# Altium PCB photo_frame-v1.2.PcbDoc (part 4 of 5)
Units mm, origin at the board's own origin, x right, y up, seen from the top; angles counter-clockwise.
Board outline 704 x 370 mm, 2 copper layers (Top Layer, Bottom Layer), stack 1.57 mm thick; 268 components, 235 nets, 1088 pads, 1398 vias.
Unrouted connection lines stored in the file: 10.
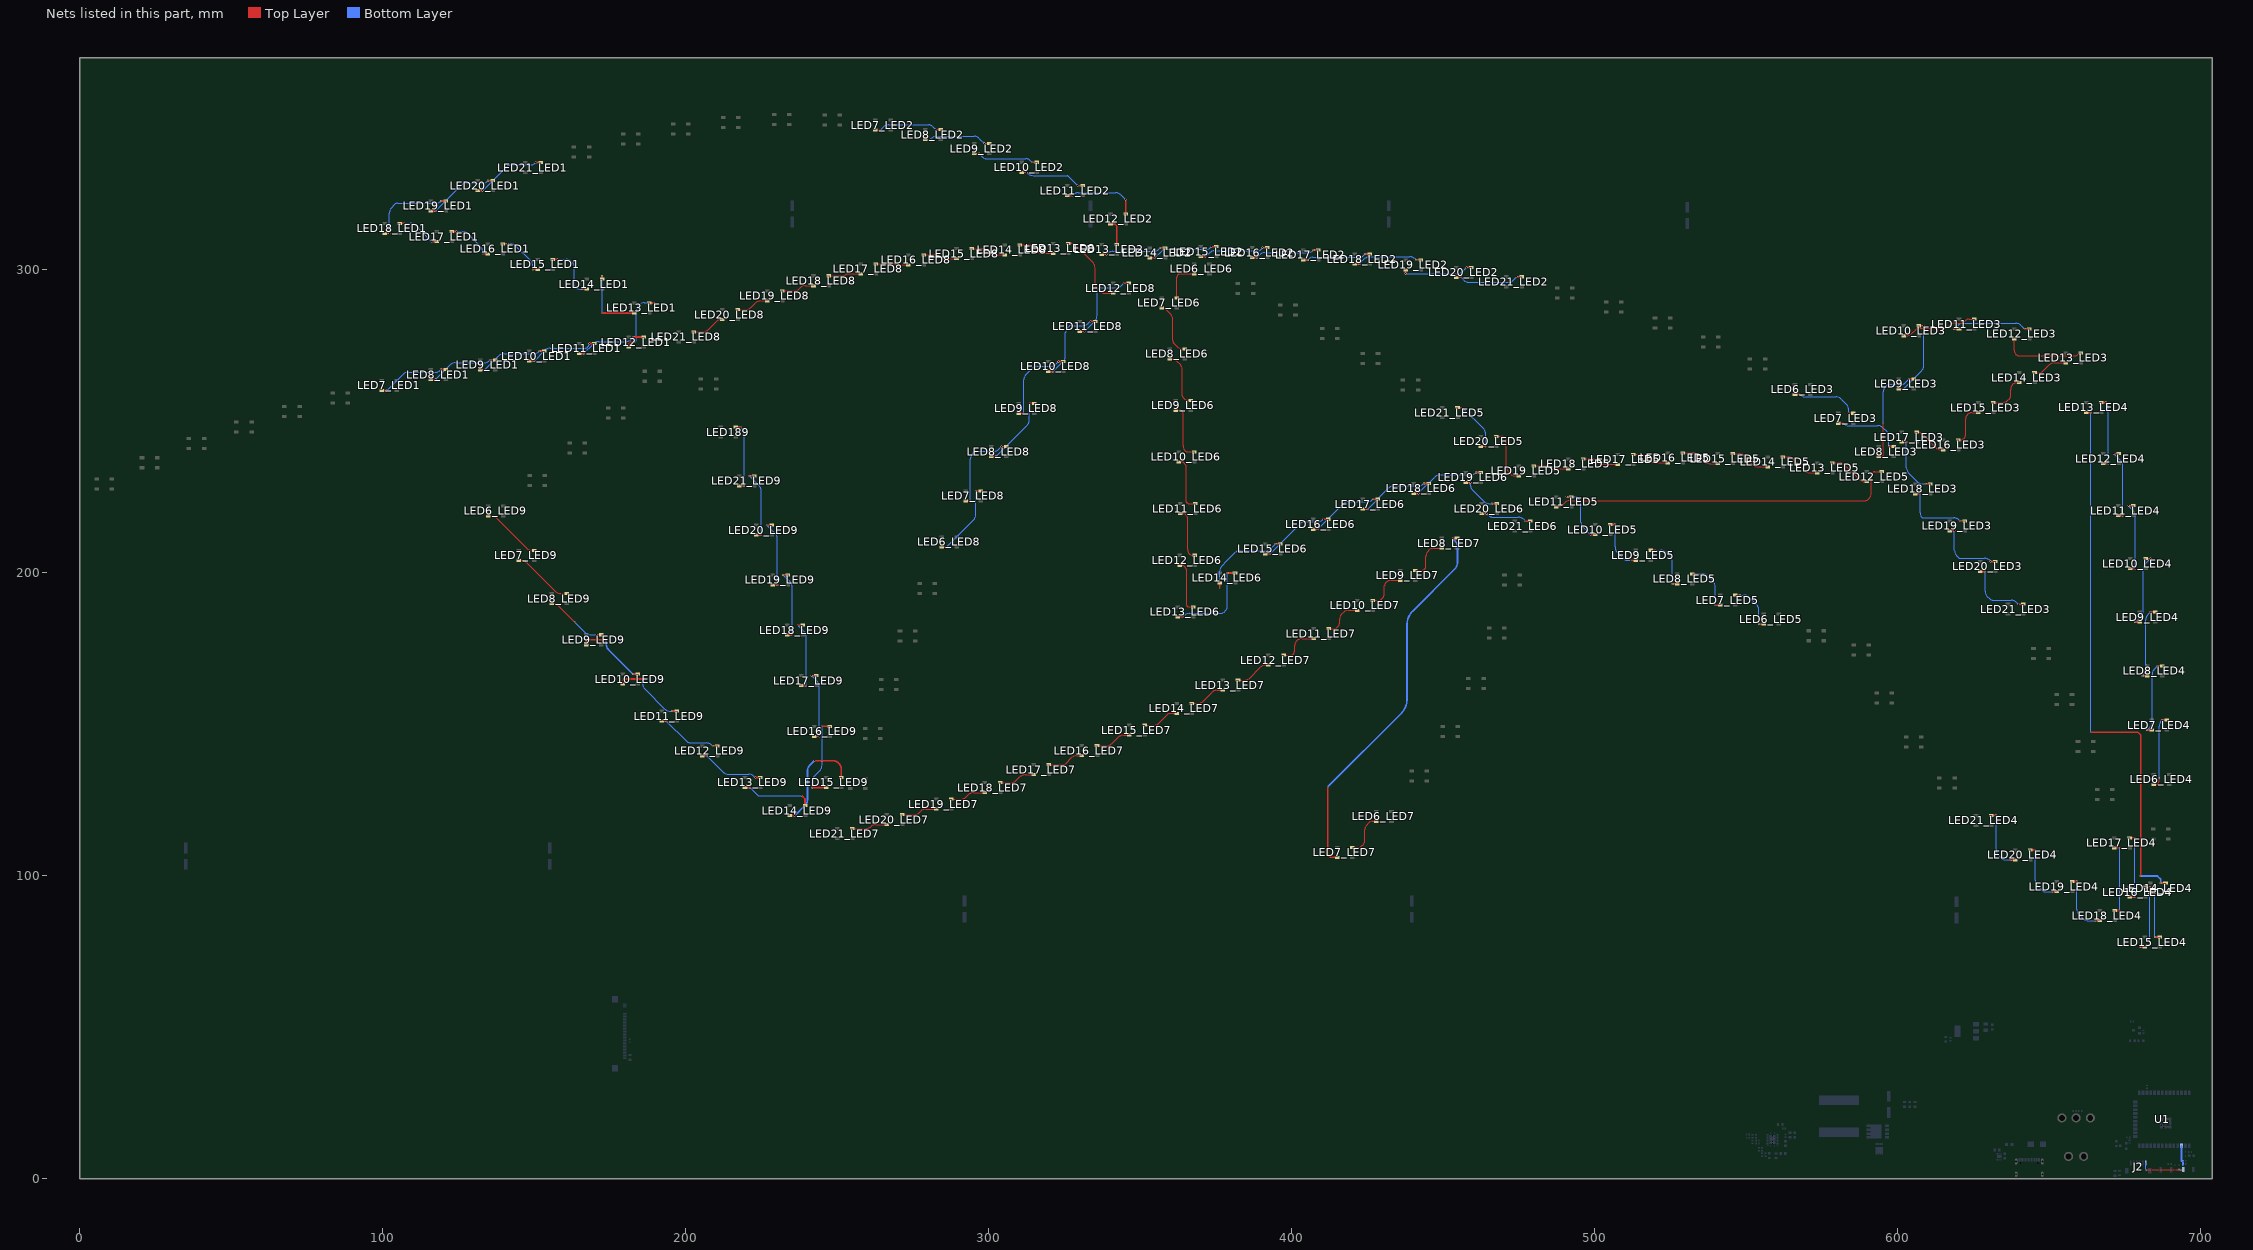
[diagram p3: the nets of this part, all layers, seen from the top]

## Via types
v1: diameter 0.6, hole 0.3, Top Layer to Bottom Layer, 709 vias
v2: diameter 0.6, hole 0.3, Top Layer to Bottom Layer, tented both sides, 689 vias

## Nets (pads, with @x,y where several pads share a name; then routed paths per layer and width w, separated by ;. In a path a pad name is that pad's centre, name@x,y a point inside that pad or via, vN(x,y) a via of type N, cw(c..) or ccw(c..) an arc to the next point about the centre after c; other vN are vias at no path point) (continued)
DOUT6_LED3: LED6_LED3.2 LED7_LED3.4 | length 22.9
  Top Layer w0.559: LED6_LED3.2@566.211,258.843 v2@567.806,258.843 ; v2@583.904,252.588 LED7_LED3.4@585.5,252.588
  Bottom Layer w0.305: v2(567.806,258.846) 567.921,258.732 ccw(c569.717,260.528) 569.717,257.988 579.744,257.988 cw(c579.744,255.448) 580.985,257.664 cw(c579.744,255.448) 581.54,257.244 583.16,255.624 cw(c581.364,253.828) 583.904,253.828 v2(583.904,252.592)
DOUT6_LED4: LED6_LED4.2 LED7_LED4.4 | length 24.4
  Top Layer w0.305: LED6_LED4.2@684.688,130.092 685.29,130.092 ccw(c685.29,131.675) 685.905,130.217 ccw(c684.688,131.434) 686.41,131.434 v2(686.41,132.182)
  Top Layer w0.559: v2@687.379,151.32 LED7_LED4.4@688.974,151.32
  Bottom Layer w0.305: v2(686.41,132.182) 686.41,149.295 cw(c688.95,149.295) 687.154,151.091 v2(687.379,151.316)
DOUT6_LED5: LED6_LED5.2 LED7_LED5.4 | length 16.4
  Top Layer w0.559: LED7_LED5.4@546.495,192.563 v2@548.09,192.563 ; v2@554.286,182.99 LED6_LED5.2@555.882,182.99
  Bottom Layer w0.305: v2(548.09,192.566) 549.306,192.566 cw(c549.306,190.026) 551.102,191.822 553.542,189.382 cw(c551.746,187.586) 554.286,187.586 v2(554.286,182.994)
DOUT6_LED6: LED6_LED6.2 LED7_LED6.4 | length 13.3
  Top Layer w0.305: LED7_LED6.4@362.198,290.636 362.198,297.555 cw(c363.206,297.555) 363.206,298.564 LED6_LED6.2@367.965,298.564
DOUT6_LED7: LED6_LED7.2 LED7_LED7.4 | length 14.3
  Top Layer w0.305: LED7_LED7.4@420.079,109.327 421.985,109.327 ccw(c421.985,111.389) 423.443,109.931 423.487,109.975 ccw(c421.691,111.771) 424.231,111.771 424.231,115.051 cw(c426.771,115.051) 424.975,116.847 425.552,117.424 cw(c426.735,116.241) 426.735,117.914 LED6_LED7.2@428.033,117.914
DOUT6_LED8: LED6_LED8.2 LED7_LED8.4 | length 25.5
  Top Layer w0.559: LED6_LED8.2@284.574,208.516 v2@286.169,208.516 ; v2@295.852,226.929 LED7_LED8.4@297.448,226.929
  Bottom Layer w0.305: v2(286.169,208.52) 295.108,217.458 ccw(c293.312,219.254) 295.852,219.254 v2(295.852,226.933)
DOUT6_LED9: LED6_LED9.2 LED7_LED9.4 | length 19.7
  Top Layer w0.305: LED6_LED9.2@134.841,218.702 135.83,218.702 cw(c135.83,216.162) 137.627,217.958 147.545,208.039 ccw(c149.341,209.835) 149.341,207.295 LED7_LED9.4@150.026,207.295
DOUT7_LED1: LED7_LED1.2 LED8_LED1.4 | length 23.8
  Top Layer w0.559: LED7_LED1.2@99.763,260.104 v2@101.359,260.104 ; v2@119.297,267.01 LED8_LED1.4@120.892,267.01
  Bottom Layer w0.305: v2(101.359,260.1) 106.612,265.353 cw(c108.408,263.557) 108.408,266.097 117.335,266.097 ccw(c117.335,268.637) 119.131,266.841 v2(119.297,267.007)
DOUT7_LED2: LED7_LED2.2 LED8_LED2.4 | length 22.7
  Top Layer w0.559: LED7_LED2.2@262.679,346.032 v2@264.275,346.032 ; v2@282.593,346.208 LED8_LED2.4@284.189,346.208
  Bottom Layer w0.305: v2(264.275,346.035) 265.272,347.033 cw(c267.068,345.237) 265.553,347.275 cw(c267.068,345.237) 267.068,347.777 280.365,347.777 cw(c280.365,346.178) 281.496,347.308 v2(282.593,346.211)
DOUT7_LED3: LED7_LED3.2 LED8_LED3.4 | length 23.6
  Top Layer w0.559: LED7_LED3.2@580.5,249.288 v2@582.095,249.288 ; v2@597.197,241.59 LED8_LED3.4@598.792,241.59
  Bottom Layer w0.305: v2(582.095,249.292) 582.148,249.239 ccw(c583.944,251.035) 583.944,248.495 593.522,248.495 cw(c593.522,246.058) 595.245,247.781 596.453,246.573 cw(c594.657,244.777) 597.197,244.777 v2(597.197,241.593)
DOUT7_LED4: LED7_LED4.2 LED8_LED4.4 | length 25.6
  Top Layer w0.559: v2@682.379,148.02 LED7_LED4.2@683.974,148.02 ; v2@685.899,169.203 LED8_LED4.4@687.495,169.203
  Bottom Layer w0.305: v2(682.379,148.023) 683.329,148.973 ccw(c681.533,150.769) 684.073,150.769 684.073,166.328 cw(c686.613,166.328) 684.736,168.04 cw(c686.613,166.328) 684.74,168.044 cw(c686.613,166.328) 684.817,168.124 v2(685.899,169.207)
DOUT7_LED5: LED7_LED5.2 LED8_LED5.4 | length 17.4
  Top Layer w0.559: LED8_LED5.4@532.347,199.573 v2@533.943,199.573 ; v2@539.899,189.263 LED7_LED5.2@541.495,189.263
  Bottom Layer w0.305: v2(533.943,199.577) 535.666,199.577 cw(c535.666,197.037) 537.462,198.833 539.155,197.14 cw(c537.359,195.344) 539.899,195.344 v2(539.899,189.266)
DOUT7_LED6: LED7_LED6.2 LED8_LED6.4 | length 17.9
  Top Layer w0.305: LED7_LED6.2@357.198,287.336 cw(c357.198,285.151) 358.743,286.696 360.091,285.348 cw(c358.295,283.552) 360.835,283.552 360.835,276.606 ccw(c362.192,276.606) 361.233,275.647 362.56,274.32 ccw(c363.772,275.533) 363.772,273.818 LED8_LED6.4@364.834,273.818
DOUT7_LED7: LED7_LED7.2 LED8_LED7.4 | length 127.1
  Top Layer w0.559: v2@411.988,129.286 411.988,107.442 ccw(c413.403,107.442) 413.403,106.027 LED7_LED7.2@415.079,106.027 ; v2@453.053,211.359 LED8_LED7.4@454.648,211.359
  Bottom Layer w0.559: v2(411.988,129.283) 436.2,153.495 ccw(c431.496,158.201) 438.15,158.201 438.15,182.803 438.15,182.805 cw(c444.464,182.805) 440,187.27 453.842,201.112 ccw(c451.501,203.455) 454.813,203.455 454.813,208.559 ccw(c452.311,208.559) 454.08,210.328 v2(453.053,211.356)
DOUT7_LED8: LED7_LED8.2 LED8_LED8.4 | length 29.3
  Top Layer w0.559: LED7_LED8.2@292.448,223.629 v2@294.043,223.629 ; v2@304.285,241.585 LED8_LED8.4@305.881,241.585
  Bottom Layer w0.305: v2(294.043,223.633) 294.043,237.442 cw(c296.583,237.442) 294.787,239.238 295.224,239.674 cw(c296.205,238.693) 296.205,240.081 302.031,240.081 ccw(c302.031,241.882) 303.305,240.608 v2(304.285,241.588)
DOUT7_LED9: LED7_LED9.2 LED8_LED9.4 | length 20.1
  Top Layer w0.305: LED7_LED9.2@145.026,203.995 145.838,203.995 cw(c145.838,201.455) 147.634,203.251 157.045,193.84 ccw(c158.841,195.636) 158.841,193.096 LED8_LED9.4@160.821,193.096
DOUT8_LED1: LED8_LED1.2 LED9_LED1.4 | length 23.8
  Top Layer w0.559: LED8_LED1.2@115.892,263.71 v2@117.488,263.71 ; v2@135.617,270.228 LED9_LED1.4@137.213,270.228
  Bottom Layer w0.305: v2(117.488,263.707) 122.309,268.528 cw(c124.105,266.732) 124.105,269.272 133.613,269.272 ccw(c133.613,271.812) 135.409,270.016 v2(135.617,270.225)
DOUT8_LED2: LED8_LED2.2 LED9_LED2.4 | length 22.4
  Top Layer w0.559: LED8_LED2.2@279.189,342.908 v2@280.785,342.908 ; v2@298.722,341.585 LED9_LED2.4@300.318,341.585
  Bottom Layer w0.305: v2(280.785,342.911) 281.147,343.274 cw(c282.943,341.478) 281.964,343.821 cw(c282.943,341.478) 282.943,344.018 295.241,344.018 cw(c295.241,341.478) 297.037,343.274 v2(298.722,341.588)
DOUT8_LED3: LED8_LED3.2 LED9_LED3.4 | length 34.9
  Top Layer w0.305: LED8_LED3.2@593.792,238.29 594.575,238.29 ccw(c594.575,239.028) 595.097,238.506 ccw(c594.476,239.126) 595.354,239.126 v2(595.354,249.409)
  Top Layer w0.559: v2@603.867,263.934 LED9_LED3.4@605.463,263.934
  Bottom Layer w0.305: v2(595.354,249.409) 595.354,259.682 cw(c597.894,259.682) 596.098,261.478 596.417,261.798 cw(c597.337,260.878) 597.337,262.179 601.472,262.179 ccw(c601.472,263.732) 602.57,262.634 v2(603.867,263.931)
DOUT8_LED4: LED8_LED4.2 LED9_LED4.4 | length 25.2
  Top Layer w0.559: v2@680.899,165.903 LED8_LED4.2@682.495,165.903 ; v2@683.478,186.981 LED9_LED4.4@685.074,186.981
  Bottom Layer w0.305: v2(680.899,165.907) 681.221,166.228 ccw(c679.425,168.024) 681.965,168.024 681.965,169.683 ccw(c682.051,169.683) 681.99,169.621 681.99,184.444 cw(c684.53,184.444) 682.272,185.608 cw(c684.53,184.444) 682.734,186.24 v2(683.478,186.985)
DOUT8_LED5: LED8_LED5.2 LED9_LED5.4 | length 18
  Top Layer w0.559: LED9_LED5.4@518.58,207.371 v2@520.176,207.371 ; v2@525.751,196.273 LED8_LED5.2@527.347,196.273
  Bottom Layer w0.305: v2(520.176,207.375) 521.95,207.375 cw(c521.95,204.835) 523.746,206.631 525.007,205.37 cw(c523.211,203.574) 525.751,203.574 v2(525.751,196.277)
DOUT8_LED6: LED8_LED6.2 LED9_LED6.4 | length 18.1
  Top Layer w0.305: LED8_LED6.2@359.834,270.518 360.378,270.518 cw(c360.378,267.978) 362.174,269.774 363.263,268.684 cw(c361.467,266.888) 364.007,266.888 364.007,258.318 ccw(c364.855,258.318) 364.256,257.719 364.678,257.297 ccw(c365.696,258.316) 365.696,256.875 LED9_LED6.4@366.754,256.875
DOUT8_LED7: LED8_LED7.2 LED9_LED7.4 | length 14.2
  Top Layer w0.305: LED9_LED7.4@440.907,200.742 442.902,200.742 ccw(c442.902,202.284) 443.992,201.193 ccw(c443.072,202.113) 444.373,202.113 444.373,205.272 cw(c446.913,205.272) 445.117,207.068 445.541,207.493 cw(c446.909,206.125) 446.909,208.059 LED8_LED7.2@449.648,208.059
DOUT8_LED8: LED8_LED8.2 LED9_LED8.4 | length 25.2
  Top Layer w0.559: LED8_LED8.2@300.881,238.285 v2@302.476,238.285 ; v2@313.454,255.885 LED9_LED8.4@315.05,255.885
  Bottom Layer w0.305: v2(302.476,238.288) 312.71,248.523 ccw(c310.914,250.319) 313.454,250.319 v2(313.454,255.889)
DOUT8_LED9: LED8_LED9.2 LED9_LED9.4 | length 20.4
  Top Layer w0.305: LED8_LED9.2@155.821,189.796 156.242,189.796 cw(c156.242,187.256) 158.039,189.052 v2(163.512,183.578)
  Top Layer w0.559: v2@170.605,179.482 LED9_LED9.4@172.2,179.482
  Bottom Layer w0.305: v2(163.512,183.578) 166.868,180.223 ccw(c168.664,182.019) 168.664,179.479 v2(170.605,179.479)
DOUT9_LED1: LED9_LED1.2 LED10_LED1.4 | length 23.6
  Top Layer w0.559: LED9_LED1.2@132.213,266.928 v2@133.809,266.928 ; v2@151.86,273.132 LED10_LED1.4@153.455,273.132
  Bottom Layer w0.305: v2(133.809,266.925) 138.409,271.525 cw(c140.205,269.729) 140.205,272.269 149.948,272.269 ccw(c149.948,274.809) 151.744,273.013 v2(151.86,273.128)
DOUT9_LED2: LED9_LED2.2 LED10_LED2.4 | length 21.7
  Top Layer w0.559: LED9_LED2.2@295.318,338.285 v2@296.914,338.285 ; v2@314.42,335.438 LED10_LED2.4@316.015,335.438
  Bottom Layer w0.305: v2(296.914,338.288) 297.901,337.301 ccw(c299.697,339.097) 299.697,336.557 312.293,336.557 cw(c312.293,334.115) 314.02,335.841 v2(314.42,335.441)
DOUT9_LED3: LED9_LED3.2 LED10_LED3.4 | length 26.7
  Top Layer w0.559: LED9_LED3.2@600.463,260.634 v2@602.058,260.634 ; LED10_LED3.4@607.079,281.475 v2@608.674,281.475
  Bottom Layer w0.305: v2(602.058,260.631) 607.93,266.503 ccw(c606.134,268.299) 608.674,268.299 v2(608.674,281.471)
DOUT9_LED4: LED9_LED4.2 LED10_LED4.4 | length 26
  Top Layer w0.559: v2@678.478,183.681 LED9_LED4.2@680.074,183.681 ; LED10_LED4.4@681.918,204.606 v2@683.514,204.606
  Bottom Layer w0.305: v2(678.478,183.685) 680.642,185.849 ccw(c679.343,187.148) 681.18,187.148 681.18,201.223 cw(c683.72,201.223) 681.924,203.02 v2(683.514,204.609)
DOUT9_LED5: LED9_LED5.2 LED10_LED5.4 | length 18
  Top Layer w0.559: LED10_LED5.4@505.22,215.855 v2@506.815,215.855 ; v2@511.985,204.071 LED9_LED5.2@513.58,204.071
  Bottom Layer w0.305: v2(506.815,215.858) 506.815,208.459 ccw(c509.355,208.459) 507.559,206.663 509.676,204.546 ccw(c510.815,205.685) 510.815,204.075 v2(511.985,204.075)
DOUT9_LED6: LED9_LED6.2 LED10_LED6.4 | length 18.6
  Top Layer w0.305: LED9_LED6.2@361.754,253.575 363.077,253.575 cw(c363.077,252.411) 363.9,253.234 cw(c363.077,252.411) 364.24,252.411 364.24,241.925 ccw(c366.78,241.925) 364.984,240.129 ccw(c365.64,240.785) 365.64,239.858 LED10_LED6.4@367.857,239.858
DOUT9_LED7: LED9_LED7.2 LED10_LED7.4 | length 13.9
  Top Layer w0.305: LED10_LED7.4@426.785,190.836 428.606,190.836 ccw(c428.606,192.551) 429.819,191.338 429.964,191.483 ccw(c428.168,193.279) 430.708,193.279 430.708,195.594 cw(c432.269,195.594) 431.165,196.698 cw(c432.961,194.902) 432.961,197.442 LED9_LED7.2@435.907,197.442
DOUT9_LED8: LED9_LED8.2 LED10_LED8.4 | length 28.5
  Top Layer w0.559: LED9_LED8.2@310.05,252.585 v2@311.646,252.585 ; v2@323.132,269.677 LED10_LED8.4@324.727,269.677
  Bottom Layer w0.305: v2(311.646,252.589) 311.646,263.578 cw(c314.186,263.578) 312.39,265.374 314.324,267.309 cw(c316.12,265.513) 316.12,268.053 320.452,268.053 ccw(c320.452,270.593) 322.248,268.797 v2(323.132,269.681)
DOUT9_LED9: LED9_LED9.2 LED10_LED9.4 | length 24.5
  Top Layer w0.559: LED9_LED9.2@167.2,176.182 167.2,177.317 167.715,177.832 v2(173.863,177.832) ; v2@182.67,166.503 LED10_LED9.4@184.265,166.503
  Bottom Layer w0.559: v2(173.863,177.832) 173.863,176.358 ccw(c176.403,176.358) 174.607,174.562 v2(182.67,166.499)
DOUT10_LED1: LED10_LED1.2 LED11_LED1.4 | length 23.9
  Top Layer w0.559: LED10_LED1.2@148.455,269.832 v2@150.051,269.832 ; v2@168.268,275.621 LED11_LED1.4@169.864,275.621
  Bottom Layer w0.305: v2(150.051,269.828) 153.544,273.322 cw(c155.341,271.526) 155.341,274.066 166.716,274.066 ccw(c166.716,275.618) v2(168.268,275.618)
DOUT10_LED2: LED10_LED2.2 LED11_LED2.4 | length 21.8
  Top Layer w0.559: LED10_LED2.2@311.015,332.138 v2@312.611,332.138 ; v2@329.482,327.716 LED11_LED2.4@331.077,327.716
  Bottom Layer w0.305: v2(312.611,332.141) 312.945,331.808 ccw(c314.741,333.604) 314.741,331.064 326.06,331.064 cw(c326.06,330.875) 326.193,331.008 v2(329.482,327.72)
DOUT10_LED3: LED10_LED3.2 LED11_LED3.4 | length 24.9
  Top Layer w0.305: LED10_LED3.2@602.079,278.175 602.928,278.175 ccw(c602.928,280.715) 604.724,278.919 605.681,279.875 cw(c607.477,278.079) 607.477,280.619 615.228,280.619 ccw(c615.228,283.159) 617.024,281.363 617.238,281.577 cw(c619.034,279.781) 619.034,282.321 620.635,282.321 ccw(c620.635,284.861) 622.431,283.065 622.593,283.227 cw(c623.661,282.159) 623.661,283.67 LED11_LED3.4@625.336,283.67
DOUT10_LED4: LED10_LED4.2 LED11_LED4.4 | length 24.8
  Top Layer w0.559: v2@676.242,222.081 LED11_LED4.4@677.838,222.081 ; LED10_LED4.2@676.918,201.306 v2@678.514,201.306
  Bottom Layer w0.305: v2(676.242,222.084) 677.77,220.557 ; 677.77,220.557 cw(c675.974,218.761) 677.846,220.477 cw(c675.974,218.761) 678.514,218.761 v2(678.514,201.309)
DOUT10_LED5: LED10_LED5.2 LED11_LED5.4 | length 20.8
  Top Layer w0.559: v2@490.746,225.024 LED11_LED5.4@492.342,225.024 ; v2@498.624,212.555 LED10_LED5.2@500.22,212.555
  Bottom Layer w0.305: v2(490.746,225.028) 494.107,225.028 495.532,223.603 495.532,216.687 ccw(c498.034,216.687) 496.265,214.918 v2(498.624,212.558)
DOUT10_LED6: LED10_LED6.2 LED11_LED6.4 | length 18
  Top Layer w0.305: LED10_LED6.2@362.857,236.558 363.341,236.558 cw(c363.341,234.537) 364.769,235.966 cw(c363.43,234.626) 365.324,234.626 365.324,223.404 ccw(c365.771,223.404) 365.455,223.088 ccw(c366.178,223.811) 366.178,222.789 LED11_LED6.4@368.288,222.789
DOUT10_LED7: LED10_LED7.2 LED11_LED7.4 | length 13.4
  Top Layer w0.305: LED11_LED7.4@412.307,181.489 413.908,181.489 ccw(c413.908,183.551) 414.317,181.53 ccw(c413.908,183.551) 415.366,182.093 ccw(c414.14,183.319) 415.874,183.319 415.874,184.556 cw(c418.389,184.556) 416.611,186.334 417.068,186.792 cw(c418.864,184.996) 418.864,187.536 LED10_LED7.2@421.785,187.536
DOUT10_LED8: LED10_LED8.2 LED11_LED8.4 | length 27.6
  Top Layer w0.559: LED10_LED8.2@319.727,266.377 v2@321.323,266.377 ; v2@333.597,282.911 LED11_LED8.4@335.192,282.911
  Bottom Layer w0.305: v2(321.323,266.374) 324.684,269.735 ccw(c322.888,271.531) 325.428,271.531 325.428,279.113 cw(c327.968,279.113) 326.172,280.909 326.288,281.026 cw(c327.515,279.799) 327.515,281.534 331.171,281.534 ccw(c331.171,284.074) 332.768,282.099 ccw(c331.171,284.074) 332.967,282.278 v2(333.597,282.907)
DOUT10_LED9: LED10_LED9.2 LED11_LED9.4 | length 24.9
  Top Layer w0.559: LED10_LED9.2@179.265,163.203 179.265,164.338 179.78,164.853 v2(185.928,164.853) ; v2@195.522,154.285 LED11_LED9.4@197.118,154.285
  Bottom Layer w0.305: v2(185.928,164.853) 185.928,163.213 ccw(c188.468,163.213) 186.672,161.416 193.063,155.026 ccw(c194.859,156.822) 194.859,154.282 v2(195.522,154.282)
DOUT11_LED1: LED11_LED1.2 LED12_LED1.4 | length 23.4
  Top Layer w0.559: LED11_LED1.2@164.864,272.321 v2@166.459,272.321 ; v2(182.875,277.749) LED12_LED1.4@186.28,277.749
  Bottom Layer w0.305: v2(166.459,272.318) 169.647,275.506 cw(c171.443,273.71) 171.443,276.25 180.323,276.25 ccw(c180.323,278.79) 182.119,276.994 v2(182.875,277.749)
DOUT11_LED2: LED11_LED2.2 LED12_LED2.4 | length 25
  Top Layer w0.559: LED11_LED2.2@326.077,324.416 v2@327.673,324.416 ; LED12_LED2.4@345.276,318.369 v2(345.276,323.088)
  Bottom Layer w0.305: v2(327.673,324.42) 327.883,324.63 cw(c329.679,322.834) 329.679,325.374 341.938,325.374 cw(c341.938,322.834) 343.734,324.63 v2(345.276,323.088)
DOUT11_LED3: LED11_LED3.2 LED12_LED3.4 | length 27.7
  Top Layer w0.559: v2@618.74,280.37 LED11_LED3.2@620.336,280.37 ; v2@641.955,280.465 LED12_LED3.4@643.551,280.465
  Bottom Layer w0.305: v2(618.74,280.366) 619.875,281.501 cw(c621.671,279.705) 621.671,282.245 639.12,282.245 cw(c639.12,279.705) 640.916,281.501 v2(641.955,280.461)
DOUT11_LED4: LED11_LED4.2 LED12_LED4.4 | length 24.8
  Top Layer w0.559: v2@671.409,239.237 LED12_LED4.4@673.004,239.237 ; LED11_LED4.2@672.838,218.781 v2@674.434,218.781
  Bottom Layer w0.305: v2(671.409,239.241) 673.69,236.959 cw(c671.894,235.163) 674.434,235.163 v2(674.434,218.784)
DOUT11_LED5: LED11_LED5.2 LED12_LED5.4 | length 116.1
  Top Layer w0.305: LED11_LED5.2@487.342,221.724 487.711,221.724 ccw(c487.711,224.264) 489.354,222.327 ccw(c487.711,224.264) 489.507,222.468 490.159,223.12 cw(c491.802,221.183) 491.802,223.723 589.093,223.723 ccw(c589.093,225.891) 590.626,224.358 ccw(c588.848,226.137) 591.363,226.137 591.363,231.732 cw(c593.184,231.732) 591.896,233.02 cw(c592.587,232.329) 592.587,233.306 LED12_LED5.4@594.82,233.306
DOUT11_LED6: LED11_LED6.2 LED12_LED6.4 | length 17.5
  Top Layer w0.305: LED11_LED6.2@363.288,219.489 363.966,219.489 cw(c363.966,217.264) 365.539,218.837 ; 365.201,219.075 cw(c363.784,217.657) 365.788,217.657 365.788,207.637 ccw(c368.328,207.637) 366.127,206.37 ccw(c367.693,207.936) 367.693,205.721 LED12_LED6.4@368.125,205.721
DOUT11_LED7: LED11_LED7.2 LED12_LED7.4 | length 13.7
  Top Layer w0.305: LED12_LED7.4@397.397,172.776 399.984,172.776 ccw(c399.984,173.624) 400.583,173.025 ccw(c399.541,174.067) 401.015,174.067 401.015,175.774 cw(c403.27,175.774) 401.676,177.368 401.752,177.445 cw(c403.548,175.649) 403.548,178.189 LED11_LED7.2@407.307,178.189
DOUT11_LED8: LED11_LED8.2 LED12_LED8.4 | length 27.9
  Top Layer w0.559: LED11_LED8.2@330.192,279.611 v2@331.788,279.611 ; v2@344.646,295.509 LED12_LED8.4@346.241,295.509
  Bottom Layer w0.305: v2(331.788,279.607) 335.095,282.914 ccw(c333.299,284.71) 335.486,283.419 ccw(c333.299,284.71) 335.839,284.71 335.839,292.887 cw(c336.268,292.887) 335.964,293.191 336.575,293.802 cw(c336.943,293.434) 336.943,293.954 342.042,293.954 ccw(c342.042,296.494) 343.64,294.52 ccw(c342.042,296.494) 343.758,294.622 ccw(c342.042,296.494) 343.838,294.698 v2(344.646,295.506)
  Bottom Layer w0.559: v2@344.644,295.508 v2@344.646,295.509
DOUT11_LED9: LED11_LED9.2 LED12_LED9.4 | length 21.5
  Top Layer w0.559: LED11_LED9.2@192.118,150.985 v2@193.713,150.985 ; v2@208.883,142.83 LED12_LED9.4@210.478,142.83
  Bottom Layer w0.305: v2(193.713,150.982) 200.187,144.508 ccw(c201.983,146.304) 201.983,143.764 206.893,143.764 cw(c206.893,141.224) 208.689,143.02 v2(208.883,142.826)
DOUT12_LED1: LED12_LED1.2 LED13_LED1.4 | length 22.6
  Top Layer w0.559: LED12_LED1.2@181.28,274.449 181.341,274.511 181.341,275.46 181.98,276.099 v2(182.875,276.099) ; LED13_LED1.4@188.067,288.999 v2@189.662,288.999
  Bottom Layer w0.305: v2(182.875,276.099) ccw(c182.875,277.004) 183.78,277.004 183.78,286.462 cw(c186.32,286.462) 186.32,289.002 v2(189.662,289.002)
DOUT12_LED2: LED12_LED2.2 LED13_LED2.4 | length 9
  Top Layer w0.559: LED12_LED2.2@340.276,315.069 341.775,315.069 342.355,314.489 342.355,313.963 ; LED13_LED2.4@342.355,308.336 342.355,313.963 ; 342.355,313.436 342.355,313.963
DOUT12_LED3: LED12_LED3.2 LED13_LED3.4 | length 27.1
  Top Layer w0.305: LED12_LED3.2@638.551,277.165 638.551,273.309 ccw(c640.334,273.309) 640.334,271.526 658.173,271.526 ; 658.174,271.526 ccw(c658.175,274.202) 659.92,272.172 LED13_LED3.4@660.515,272.52
DOUT12_LED4: LED12_LED4.2 LED13_LED4.4 | length 23.6
  Top Layer w0.559: LED13_LED4.4@667.279,256.148 v2@668.875,256.148 ; LED12_LED4.2@668.004,235.937 v2@669.6,235.937
  Bottom Layer w0.305: v2(668.875,256.151) cw(c667.123,254.4) 669.6,254.4 v2(669.6,235.941)
DOUT12_LED5: LED12_LED5.2 LED13_LED5.4 | length 13.6
  Top Layer w0.305: LED13_LED5.4@578.557,236.22 580.912,236.22 cw(c580.912,233.68) 582.709,235.476 587.435,230.75 ccw(c589.231,232.546) 589.231,230.006 LED12_LED5.2@589.82,230.006
DOUT12_LED6: LED12_LED6.2 LED13_LED6.4 | length 17.1
  Top Layer w0.305: LED12_LED6.2@363.125,202.421 363.455,202.421 cw(c363.455,200.311) 364.947,201.803 cw(c363.898,200.753) 365.382,200.753 365.382,189.26 ccw(c365.892,189.26) 365.531,188.9 ccw(c366.07,189.438) 366.07,188.677 LED13_LED6.4@367.526,188.677
DOUT12_LED7: LED12_LED7.2 LED13_LED7.4 | length 11.9
  Top Layer w0.305: LED13_LED7.4@382.371,164.546 384.675,164.546 ccw(c384.675,166.785) 386.258,165.202 389.789,168.732 cw(c391.585,166.936) 391.585,169.476 LED12_LED7.2@392.397,169.476
DOUT12_LED8: LED12_LED8.2 LED13_LED8.4 | length 25.5
  Top Layer w0.305: LED13_LED8.4@326.393,308.667 327.16,308.667 cw(c327.16,306.127) 328.442,308.32 cw(c327.16,306.127) 328.956,307.923 334.434,302.445 cw(c332.638,300.649) 335.178,300.649 335.178,295.427 ccw(c337.57,295.427) 335.879,293.736 336.662,292.953 ccw(c338.458,294.749) 338.458,292.209 LED12_LED8.2@341.241,292.209
DOUT12_LED9: LED12_LED9.2 LED13_LED9.4 | length 21.9
  Top Layer w0.559: LED12_LED9.2@205.478,139.53 v2@207.074,139.53 ; v2@223.056,132.39 LED13_LED9.4@224.651,132.39
  Bottom Layer w0.305: v2(207.074,139.526) 212.43,134.17 ccw(c214.226,135.966) 214.226,133.426 220.964,133.426 cw(c220.964,130.886) 222.761,132.682 v2(223.056,132.387)
DOUT13_LED1: LED13_LED1.2 LED14_LED1.4 | length 23.9
  Top Layer w0.559: LED14_LED1.4@172.458,296.873 v2(172.458,297.942) ; v2(172.466,285.75) 172.477,285.75 172.525,285.702 183.063,285.702 LED13_LED1.2@183.067,285.699
  Bottom Layer w0.305: v2(172.458,297.942) 172.462,297.938 172.462,285.754 v2(172.466,285.75)
DOUT13_LED2: LED13_LED2.2 LED14_LED2.4 | length 21.6
  Top Layer w0.559: LED13_LED2.2@337.355,305.036 v2@338.951,305.036 ; v2@356.674,307.167 LED14_LED2.4@358.27,307.167
  Bottom Layer w0.305: v2@338.964,305.029 cw(c341.045,303.333) 341.045,306.017 354.203,306.017 354.543,306.017 ccw(c354.543,308.388) 356.22,306.712 356.665,307.157 v2@356.665,307.178
  other v2: 338.951,305.04 356.674,307.17
DOUT13_LED3: LED13_LED3.2 LED14_LED3.4 | length 11.4
  Top Layer w0.305: LED14_LED3.4@645.261,265.969 646.863,265.969 ccw(c646.863,267.512) 647.954,266.421 650.01,268.476 cw(c651.806,266.68) 651.806,269.22 LED13_LED3.2@655.515,269.22
DOUT13_LED4: LED13_LED4.2 LED14_LED4.4 | length 180.4
  Top Layer w0.559: LED13_LED4.2@662.279,252.848 v2@663.875,252.848 ; v2(663.883,147.301) 679.402,147.301 680.291,146.412 v2(680.291,99.829) ; v2@686.896,97.53 LED14_LED4.4@688.491,97.53
  Bottom Layer w0.305: v2(663.875,252.851) 663.875,147.309 v2(663.883,147.301)
  Bottom Layer w0.559: v2(680.291,99.829) 685.879,99.829 686.896,98.812 v2(686.896,97.534)
DOUT13_LED5: LED13_LED5.2 LED14_LED5.4 | length 13.4
  Top Layer w0.305: LED14_LED5.4@562.148,238.227 563.793,238.227 cw(c563.793,235.687) 565.589,237.483 569.408,233.664 ccw(c571.204,235.46) 571.018,232.927 ccw(c571.204,235.46) 571.204,232.92 LED13_LED5.2@573.557,232.92
DOUT13_LED6: LED13_LED6.2 LED14_LED6.4 | length 31.5
  Top Layer w0.559: LED13_LED6.2@362.526,185.377 v2@364.122,185.377 ; v2(378.869,199.905) 378.881,199.905 378.907,199.878 LED14_LED6.4@381.369,199.878
  Bottom Layer w0.305: v2(364.122,185.373) 364.535,185.787 cw(c366.258,184.064) 366.258,186.5 376.329,186.5 ccw(c376.329,189.04) 378.869,189.04 v2(378.869,199.905)
DOUT13_LED7: LED13_LED7.2 LED14_LED7.4 | length 11.8
  Top Layer w0.305: LED14_LED7.4@367.145,156.825 369.057,156.825 ccw(c369.057,159.365) 370.853,157.569 373.786,160.502 cw(c375.582,158.706) 375.582,161.246 LED13_LED7.2@377.371,161.246
DOUT13_LED8: LED13_LED8.2 LED14_LED8.4 | length 11.9
  Top Layer w0.305: LED14_LED8.4@310.402,308.184 312.835,308.184 cw(c312.835,305.644) 314.632,307.44 316.027,306.045 ccw(c317.662,307.68) 317.467,305.376 ccw(c317.662,307.68) 317.662,305.367 LED13_LED8.2@321.393,305.367
DOUT13_LED9: LED13_LED9.2 LED14_LED9.4 | length 23.6
  Top Layer w0.559: LED13_LED9.2@219.651,129.09 v2@221.247,129.09 ; v2(238.382,126.352) 239.46,125.275 LED14_LED9.4@239.46,123.094
  Bottom Layer w0.305: v2(221.247,129.087) 223.149,127.185 223.982,126.352 225.16,126.352 v2(238.382,126.352)
DOUT14_LED1: LED14_LED1.2 LED15_LED1.4 | length 19.2
  Top Layer w0.559: LED15_LED1.4@156.259,303.381 v2@157.855,303.381 ; v2@165.862,293.573 LED14_LED1.2@167.458,293.573
  Bottom Layer w0.305: v2(157.855,303.377) 160.695,303.377 cw(c160.695,300.837) 162.491,302.633 162.763,302.362 cw(c161.537,301.135) 163.271,301.135 163.271,294.851 ccw(c163.965,294.851) 163.474,294.361 ; 163.474,294.361 163.521,294.314 ccw(c165.317,296.11) 165.317,293.57 v2(165.862,293.57)
DOUT14_LED2: LED14_LED2.2 LED15_LED2.4 | length 23.2
  Top Layer w0.559: LED14_LED2.2@353.27,303.867 v2@354.866,303.867 ; v2@373.55,307.561 LED15_LED2.4@375.146,307.561
  Bottom Layer w0.305: v2(354.866,303.87) 356.963,305.968 cw(c358.759,304.172) 358.759,306.712 371.983,306.712 ccw(c371.983,308.435) 373.201,307.216 v2(373.55,307.565)
DOUT14_LED3: LED14_LED3.2 LED15_LED3.4 | length 13.2
  Top Layer w0.305: LED15_LED3.4@631.65,256.113 634.69,256.113 ccw(c634.69,258.653) 636.486,256.857 637.032,257.404 ccw(c636.235,258.201) 637.362,258.201 637.362,260.368 cw(c639.902,260.368) 637.848,261.862 cw(c639.902,260.368) 638.106,262.164 638.229,262.287 cw(c639.15,261.367) 639.15,262.669 LED14_LED3.2@640.261,262.669
DOUT14_LED4: LED14_LED4.2 LED15_LED4.4 | length 17.6
  Top Layer w0.559: LED14_LED4.2@683.491,94.23 v2(684.98,94.23) ; v2@684.98,79.711 LED15_LED4.4@686.576,79.711
  Bottom Layer w0.305: v2(684.98,79.714) v2(684.98,94.23)
DOUT14_LED5: LED14_LED5.2 LED15_LED5.4 | length 13.1
  Top Layer w0.305: LED15_LED5.4@545.69,239.299 547.531,239.299 cw(c547.531,236.759) 549.328,238.555 552.212,235.671 ccw(c554.008,237.467) 553.767,234.938 ccw(c554.008,237.467) 554.008,234.927 LED14_LED5.2@557.148,234.927
DOUT14_LED6: LED14_LED6.2 LED15_LED6.4 | length 31.4
  Top Layer w0.559: v2(376.369,194.818) LED14_LED6.2@376.369,196.578 ; v2@394.76,209.505 LED15_LED6.4@396.355,209.505
  Bottom Layer w0.305: v2(376.369,194.818) 376.369,198.222 376.369,200.475 cw(c378.909,200.475) 377.113,202.271 378.706,203.863 381.363,206.52 cw(c383.159,204.724) 383.159,207.264 391.47,207.264 ccw(c391.47,209.804) 393.266,208.008 v2(394.76,209.501)
DOUT14_LED7: LED14_LED7.2 LED15_LED7.4 | length 12
  Top Layer w0.305: LED15_LED7.4@351.524,149.662 354.829,149.662 ccw(c354.829,151.291) 355.981,150.139 358.623,152.781 cw(c360.419,150.985) 360.419,153.525 LED14_LED7.2@362.145,153.525
DOUT14_LED8: LED14_LED8.2 LED15_LED8.4 | length 11.6
  Top Layer w0.305: LED15_LED8.4@294.451,306.939 297.138,306.939 cw(c297.138,304.399) 298.934,306.195 299.502,305.628 ccw(c301.298,307.424) 301.298,304.884 LED14_LED8.2@305.402,304.884
DOUT14_LED9: LED14_LED9.2 LED15_LED9.4 | length 35.4
  Top Layer w0.559: LED14_LED9.2@234.46,119.794 v2@236.055,119.794 ; v2(242.529,137.922) 248.63,137.922 cw(c248.63,135.382) 250.426,137.178 250.698,136.906 cw(c248.969,135.177) 251.414,135.177 LED15_LED9.4@251.414,132.378
  Bottom Layer w0.559: v2(236.055,119.791) 239.54,123.275 ccw(c237.744,125.071) 240.284,125.071 240.284,134.624 cw(c242.824,134.624) 241.028,136.42 v2(242.529,137.922)
DOUT15_LED1: LED15_LED1.2 LED16_LED1.4 | length 16.1
  Top Layer w0.559: LED16_LED1.4@139.666,308.527 v2@141.261,308.527 ; v2@149.664,300.081 LED15_LED1.2@151.259,300.081
  Bottom Layer w0.305: v2(141.261,308.524) 142.239,308.524 cw(c142.239,305.984) 144.035,307.78 148.92,302.896 cw(c147.124,301.1) 149.664,301.1 v2(149.664,300.084)
DOUT15_LED2: LED15_LED2.2 LED16_LED2.4 | length 23
  Top Layer w0.559: LED15_LED2.2@370.146,304.261 v2@371.741,304.261 ; v2@390.485,307.244 LED16_LED2.4@392.081,307.244
  Bottom Layer w0.305: v2(371.741,304.265) 373.139,305.663 cw(c374.348,304.454) 374.348,306.163 388.047,306.163 388.84,306.163 ccw(c388.84,307.522) 389.801,306.561 390.482,307.243 v2@390.482,307.25
  other v2: 390.485,307.248
DOUT15_LED3: LED15_LED3.2 LED16_LED3.4 | length 13.9
  Top Layer w0.305: LED16_LED3.4@620.093,243.792 620.643,243.792 ccw(c620.643,245.776) 622.046,244.373 ccw(c620.881,245.539) 622.529,245.539 622.529,250.699 cw(c624.61,250.699) 623.138,252.171 cw(c624.688,250.621) 624.566,252.81 cw(c624.688,250.621) 624.688,252.813 LED15_LED3.2@626.65,252.813
DOUT15_LED4: LED15_LED4.2 LED16_LED4.4 | length 25.6
  Top Layer w0.559: v2@679.98,76.411 LED15_LED4.2@681.576,76.411 ; LED16_LED4.4@681.773,96.19 v2@683.369,96.19
  Bottom Layer w0.305: v2(679.98,76.414) 681.48,76.414 ccw(c681.48,78.285) 682.803,76.962 682.871,77.031 ccw(c681.67,78.232) 683.369,78.232 v2(683.369,96.193)
DOUT15_LED5: LED15_LED5.2 LED16_LED5.4 | length 12.7
  Top Layer w0.305: LED16_LED5.4@529.214,239.543 532.251,239.543 cw(c532.251,237.003) 534.047,238.799 536.103,236.743 ccw(c537.899,238.539) 537.482,236.033 ccw(c537.899,238.539) 537.899,235.999 LED15_LED5.2@540.69,235.999
DOUT15_LED6: LED15_LED6.2 LED16_LED6.4 | length 25.3
  Top Layer w0.559: LED15_LED6.2@391.355,206.205 v2@392.951,206.205 ; v2@410.533,217.607 LED16_LED6.4@412.129,217.607
  Bottom Layer w0.305: v2(392.951,206.201) 402.725,215.975 cw(c404.521,214.179) 404.521,216.719 408.596,216.719 ccw(c408.596,219.259) 410.313,217.387 ccw(c408.596,219.259) 410.393,217.463 v2(410.533,217.604)
  Bottom Layer w0.559: v2@410.531,217.606 v2@410.533,217.607
DOUT15_LED7: LED15_LED7.2 LED16_LED7.4 | length 11.9
  Top Layer w0.305: LED16_LED7.4@335.827,142.855 339.009,142.855 ccw(c339.009,145.395) 340.805,143.599 342.824,145.618 cw(c344.62,143.822) 344.62,146.362 LED15_LED7.2@346.524,146.362
DOUT15_LED8: LED15_LED8.2 LED16_LED8.4 | length 11.2
  Top Layer w0.305: LED16_LED8.4@278.586,304.855 282.148,304.855 cw(c282.148,302.672) 283.693,304.216 ccw(c285.085,305.608) 285.085,303.639 LED15_LED8.2@289.451,303.639
DOUT15_LED9: LED15_LED9.2 LED16_LED9.4 | length 28.4
  Top Layer w0.559: v2(241.808,129.078) LED15_LED9.2@246.414,129.078 ; v2(245.069,149.274) 245.081,149.274 245.107,149.248 LED16_LED9.4@247.569,149.248
  Bottom Layer w0.305: v2(241.808,129.078) 241.808,131.009 cw(c244.348,131.009) 242.552,132.805 244.326,134.578 ccw(c242.529,136.374) 245.069,136.374 v2(245.069,149.274)
DOUT16_LED1: LED16_LED1.2 LED17_LED1.4 | length 15.6
  Top Layer w0.559: LED17_LED1.4@122.852,312.568 v2@124.448,312.568 ; v2@133.07,305.227 LED16_LED1.2@134.666,305.227
  Bottom Layer w0.305: v2(124.448,312.565) 126.387,312.565 cw(c126.387,310.025) 128.183,311.821 132.326,307.678 cw(c130.53,305.882) 133.07,305.882 v2(133.07,305.23)
DOUT16_LED2: LED16_LED2.2 LED17_LED2.4 | length 22.7
  Top Layer w0.559: LED16_LED2.2@387.081,303.944 v2@388.676,303.944 ; v2@407.327,306.495 LED17_LED2.4@408.923,306.495
  Bottom Layer w0.305: v2(388.676,303.948) 389.604,304.875 cw(c391.4,303.079) 391.4,305.619 405.396,305.619 ccw(c405.396,308.159) 407.192,306.363 v2(407.327,306.498)
DOUT16_LED3: LED16_LED3.2 LED17_LED3.4 | length 10.9
  Top Layer w0.305: LED17_LED3.4@606.39,246.353 606.517,246.353 cw(c606.517,243.813) 608.313,245.609 612.686,241.236 ccw(c614.482,243.032) 614.482,240.492 LED16_LED3.2@615.093,240.492
DOUT16_LED4: LED16_LED4.2 LED17_LED4.4 | length 22.9
  Top Layer w0.559: LED17_LED4.4@676.615,112.455 v2@678.363,112.455 ; LED16_LED4.2@676.773,92.89 v2@678.369,92.89
  Bottom Layer w0.305: v2(678.363,112.458) 678.363,92.899 v2(678.369,92.893)
DOUT16_LED5: LED16_LED5.2 LED17_LED5.4 | length 12.3
  Top Layer w0.305: LED17_LED5.4@512.781,238.981 515.084,238.981 cw(c515.084,236.441) 516.88,238.237 518.13,236.987 ccw(c519.926,238.783) 519.926,236.243 LED16_LED5.2@524.214,236.243
DOUT16_LED6: LED16_LED6.2 LED17_LED6.4 | length 25.3
  Top Layer w0.559: LED16_LED6.2@407.129,214.307 v2@408.724,214.307 ; v2@426.942,224.237 LED17_LED6.4@428.537,224.237
  Bottom Layer w0.305: v2(408.724,214.304) 417.101,222.681 cw(c418.898,220.885) 418.898,223.425 425.081,223.425 ccw(c425.081,225.965) 426.877,224.169 v2(426.942,224.233)
DOUT16_LED7: LED16_LED7.2 LED17_LED7.4 | length 11.9
  Top Layer w0.305: LED17_LED7.4@319.927,136.581 324.39,136.581 ccw(c324.39,138.297) 325.603,137.084 327.33,138.811 cw(c329.126,137.015) 329.126,139.555 LED16_LED7.2@330.827,139.555
DOUT16_LED8: LED16_LED8.2 LED17_LED8.4 | length 10.8
  Top Layer w0.305: LED17_LED8.4@262.853,301.859 263.195,301.859 cw(c263.365,301.689) 263.365,301.93 268.558,301.93 cw(c268.558,301.071) 268.872,301.87 cw(c268.558,301.071) 269.165,301.678 ccw(c269.712,302.834) 269.712,301.555 LED16_LED8.2@273.586,301.555
DOUT16_LED9: LED16_LED9.2 LED17_LED9.4 | length 24.2
  Top Layer w0.559: v2@241.612,165.97 LED17_LED9.4@243.208,165.97 ; LED16_LED9.2@242.569,145.948 v2@244.165,145.948
  Bottom Layer w0.305: v2(241.612,165.967) 243.421,164.158 cw(c241.625,162.362) 244.165,162.362 v2(244.165,145.945)
DOUT17_LED1: LED17_LED1.2 LED18_LED1.4 | length 14.6
  Top Layer w0.559: LED18_LED1.4@105.669,315.289 v2@107.265,315.289 ; v2@116.256,309.268 LED17_LED1.2@117.852,309.268
  Bottom Layer w0.305: v2(107.265,315.293) 109.183,315.293 cw(c109.183,312.753) 110.979,314.549 v2(116.256,309.272)
DOUT17_LED2: LED17_LED2.2 LED18_LED2.4 | length 22.6
  Top Layer w0.559: LED17_LED2.2@403.923,303.195 v2@405.519,303.195 ; v2@424.234,305.139 LED18_LED2.4@425.83,305.139
  Bottom Layer w0.305: v2(405.519,303.198) 405.926,303.605 cw(c407.087,302.445) 407.087,304.086 421.777,304.086 422.478,304.086 ccw(c422.478,305.778) 423.674,304.582 v2(424.234,305.142) v2(424.234,305.142)
DOUT17_LED3: LED17_LED3.2 LED18_LED3.4 | length 20.5
  Top Layer w0.559: LED17_LED3.2@601.39,243.053 v2@602.985,243.053 ; v2@609.282,229.308 LED18_LED3.4@610.878,229.308
  Bottom Layer w0.305: v2(602.985,243.05) 602.985,234.616 ccw(c605.525,234.616) 603.729,232.82 606.704,229.845 ccw(c608.007,231.147) 608.007,229.305 v2(609.282,229.305)
DOUT17_LED4: LED17_LED4.2 LED18_LED4.4 | length 24.1
  Top Layer w0.559: LED17_LED4.2@671.615,109.155 v2@673.414,109.155 ; LED18_LED4.4@671.819,88.44 v2@673.414,88.44
  Bottom Layer w0.305: v2(673.414,88.443) v2(673.414,109.158)
DOUT17_LED5: LED17_LED5.2 LED18_LED5.4 | length 12
  Top Layer w0.305: LED18_LED5.4@496.298,237.558 498.955,237.558 cw(c498.955,235.018) 500.751,236.814 501.167,236.398 ccw(c502.898,238.128) 502.898,235.681 LED17_LED5.2@507.781,235.681
DOUT17_LED6: LED17_LED6.2 LED18_LED6.4 | length 25.1
  Top Layer w0.559: LED17_LED6.2@423.537,220.937 v2@425.133,220.937 ; v2@443.731,229.418 LED18_LED6.4@445.327,229.418
  Bottom Layer w0.305: v2(425.133,220.933) 432.037,227.837 cw(c433.833,226.041) 433.833,228.581 441.845,228.581 ccw(c441.845,231.121) 443.561,229.249 ccw(c441.845,231.121) 443.641,229.325 v2(443.731,229.415)
  Bottom Layer w0.559: v2@443.729,229.417 v2@443.731,229.418
DOUT17_LED7: LED17_LED7.2 LED18_LED7.4 | length 12.2
  Top Layer w0.305: LED18_LED7.4@303.849,130.663 307.48,130.663 ccw(c307.48,133.159) 307.52,130.664 ccw(c307.48,133.159) 309.245,131.394 310.388,132.537 cw(c312.184,130.741) 312.184,133.281 LED17_LED7.2@314.927,133.281 LED17_LED7.2@315.214,133.281
DOUT17_LED8: LED17_LED8.2 LED18_LED8.4 | length 10.8
  Top Layer w0.305: LED18_LED8.4@247.257,297.973 252.274,297.973 ccw(c252.274,298.474) 252.628,298.12 252.714,298.205 cw(c253.568,297.351) 253.568,298.559 LED17_LED8.2@257.853,298.559
DOUT17_LED9: LED17_LED9.2 LED18_LED9.4 | length 24.2
  Top Layer w0.559: v2@237.051,182.632 LED18_LED9.4@238.647,182.632 ; LED17_LED9.2@238.208,162.67 v2@239.804,162.67
  Bottom Layer w0.305: v2(237.051,182.628) 239.06,180.62 cw(c237.264,178.824) 239.804,178.824 v2(239.804,162.667)
DOUT18_LED1: LED18_LED1.2 LED19_LED1.4 | length 28.9
  Top Layer w0.559: LED18_LED1.2@100.669,311.989 v2@102.265,311.989 ; v2@119.347,322.661 LED19_LED1.4@120.943,322.661
  Bottom Layer w0.305: v2(102.265,311.993) 102.265,318.666 cw(c104.805,318.666) 103.009,320.462 104.087,321.54 ; 104.088,321.541 cw(c104.957,320.67) 104.957,321.901 117.531,321.901 ccw(c117.531,324.441) 119.327,322.645 v2(119.347,322.664)
DOUT18_LED2: LED18_LED2.2 LED19_LED2.4 | length 23
  Top Layer w0.559: LED18_LED2.2@420.83,301.839 v2@422.425,301.839 ; v2@441.076,303.225 LED19_LED2.4@442.672,303.225
  Bottom Layer w0.305: v2(422.425,301.842) 424.087,303.504 cw(c425.883,301.708) 425.883,304.248 439.004,304.248 cw(c439.004,301.708) 440.8,303.504 v2(441.076,303.228)
DOUT18_LED3: LED18_LED3.2 LED19_LED3.4 | length 24
  Top Layer w0.559: LED18_LED3.2@605.878,226.008 v2@607.473,226.008 ; v2@620.658,217.098 LED19_LED3.4@622.254,217.098
  Bottom Layer w0.305: v2(607.473,226.005) 607.473,219.692 ccw(c609.531,219.692) 607.482,219.501 ccw(c609.531,219.692) 608.076,218.237 ccw(c608.567,218.727) 608.567,218.034 618.667,218.034 cw(c618.667,215.494) 620.463,217.29 v2(620.658,217.095)
DOUT18_LED4: LED18_LED4.2 LED19_LED4.4 | length 20.3
  Top Layer w0.559: LED19_LED4.4@657.658,98.016 v2@659.254,98.016 ; v2@665.223,85.14 LED18_LED4.2@666.819,85.14
  Bottom Layer w0.305: v2(659.254,98.02) 659.254,88.838 ccw(c661.794,88.838) 659.998,87.042 661.152,85.887 ccw(c662.948,87.683) 662.948,85.143 v2(665.223,85.143)
DOUT18_LED5: LED18_LED5.2 LED19_LED5.4 | length 11.6
  Top Layer w0.305: LED19_LED5.4@480.001,235.206 484.025,235.206 cw(c484.025,233.378) 485.318,234.671 ccw(c486.314,235.667) 486.314,234.258 LED18_LED5.2@491.298,234.258
DOUT18_LED6: LED18_LED6.2 LED19_LED6.4 | length 24.8
  Top Layer w0.559: LED18_LED6.2@440.327,226.118 v2@441.922,226.118 ; v2@460.876,233.051 LED19_LED6.4@462.472,233.051
  Bottom Layer w0.305: v2(441.922,226.115) 447.277,231.469 cw(c449.073,229.673) 449.073,232.213 458.99,232.213 ccw(c458.99,234.753) 460.786,232.957 v2(460.876,233.047)
DOUT18_LED7: LED18_LED7.2 LED19_LED7.4 | length 11.8
  Top Layer w0.305: LED19_LED7.4@287.745,125.228 291.074,125.228 ccw(c291.074,127.29) 291.164,125.23 ccw(c291.074,127.29) 292.532,125.832 293.319,126.619 cw(c295.116,124.823) 295.116,127.363 LED18_LED7.2@298.849,127.363
DOUT18_LED8: LED18_LED8.2 LED19_LED8.4 | length 10.9
  Top Layer w0.305: LED19_LED8.4@231.992,292.944 236.501,292.944 ccw(c236.501,293.445) 236.855,293.091 237.693,293.929 cw(c239.49,292.133) 239.49,294.673 LED18_LED8.2@242.257,294.673
DOUT18_LED9: LED18_LED9.2 LED19_LED9.4 | length 24.3
  Top Layer w0.559: v2@232.174,199.243 LED19_LED9.4@233.77,199.243 ; LED18_LED9.2@233.647,179.332 v2@235.242,179.332
  Bottom Layer w0.305: v2(232.174,199.247) 234.498,196.922 cw(c232.702,195.126) 235.242,195.126 v2(235.242,179.328)
DOUT19_LED1: LED19_LED1.2 LED20_LED1.4 | length 24.4
  Top Layer w0.559: LED19_LED1.2@115.943,319.361 v2@117.538,319.361 ; v2@134.849,329.361 LED20_LED1.4@136.444,329.361
  Bottom Layer w0.305: v2(117.538,319.364) 125.96,327.786 cw(c127.756,325.99) 127.756,328.53 132.962,328.53 ccw(c132.962,331.07) 134.758,329.274 v2(134.849,329.365)
DOUT19_LED2: LED19_LED2.2 LED20_LED2.4 | length 23.7
  Top Layer w0.559: v2(437.672,298.707) LED19_LED2.2@437.672,299.925 ; v2@457.831,300.76 LED20_LED2.4@459.426,300.76
  Bottom Layer w0.305: v2@437.672,298.704 454.719,298.704 ccw(c454.719,301.244) 456.515,299.448 v2(457.831,300.763)
DOUT19_LED3: LED19_LED3.2 LED20_LED3.4 | length 23.5
  Top Layer w0.559: LED19_LED3.2@617.254,213.798 v2@618.849,213.798 ; v2@630.783,203.679 LED20_LED3.4@632.378,203.679
  Bottom Layer w0.305: v2(618.849,213.795) 618.849,207.296 ccw(c621.389,207.296) 619.361,205.768 ccw(c621.389,207.296) 619.593,205.5 620.039,205.054 ccw(c620.775,205.79) 620.775,204.749 628.657,204.749 cw(c628.657,202.209) 630.453,204.005 v2(630.783,203.676)
DOUT19_LED4: LED19_LED4.2 LED20_LED4.4 | length 20.8
  Top Layer w0.559: LED20_LED4.4@643.931,108.464 v2@645.527,108.464 ; v2@651.063,94.716 LED19_LED4.2@652.658,94.716
  Bottom Layer w0.305: v2(645.527,108.467) 645.527,98.424 ccw(c648.067,98.424) 646.271,96.628 647.962,94.937 ccw(c648.487,95.463) 648.487,94.72 v2(651.063,94.72)
DOUT19_LED5: LED19_LED5.2 LED20_LED5.4 | length 18.4
  Top Layer w0.305: LED20_LED5.4@467.562,244.964 469.462,244.964 cw(c469.462,243.554) 470.459,244.551 cw(c469.294,243.386) 470.941,243.386 470.941,234.961 ccw(c473.481,234.961) 471.685,233.165 472.2,232.65 ccw(c473.996,234.446) 473.996,231.906 LED19_LED5.2@475.001,231.906
DOUT19_LED6: LED19_LED6.2 LED20_LED6.4 | length 14.1
  Top Layer w0.559: LED19_LED6.2@457.472,229.751 v2@459.067,229.751 ; v2@466.21,222.764 LED20_LED6.4@467.806,222.764
  Bottom Layer w0.305: v2(459.067,229.747) 459.067,228.979 ccw(c461.607,228.979) 459.811,227.183 463.49,223.504 ccw(c465.286,225.3) 465.286,222.76 v2(466.21,222.76)
DOUT19_LED7: LED19_LED7.2 LED20_LED7.4 | length 11.8
  Top Layer w0.305: LED20_LED7.4@271.489,120.148 275.509,120.148 ccw(c275.509,122.688) 277.305,120.892 277.597,121.184 cw(c279.393,119.388) 279.393,121.928 LED19_LED7.2@282.745,121.928
DOUT19_LED8: LED19_LED8.2 LED20_LED8.4 | length 10.8
  Top Layer w0.305: LED20_LED8.4@217.184,286.822 219.883,286.822 ccw(c219.883,289.362) 221.679,287.566 223.012,288.9 cw(c224.808,287.104) 224.808,289.644 LED19_LED8.2@226.992,289.644
DOUT19_LED9: LED19_LED9.2 LED20_LED9.4 | length 24.3
  Top Layer w0.559: v2@226.815,215.652 LED20_LED9.4@228.411,215.652 ; LED19_LED9.2@228.77,195.943 v2@230.366,195.943
  Bottom Layer w0.305: v2(226.815,215.655) 229.622,212.848 cw(c227.826,211.052) 230.366,211.052 v2(230.366,195.947)
DOUT20_LED1: LED20_LED1.2 LED21_LED1.4 | length 24.3
  Top Layer w0.559: LED20_LED1.2@131.444,326.061 v2@133.04,326.061 ; v2@150.564,335.336 LED21_LED1.4@152.16,335.336
  Bottom Layer w0.305: v2(133.04,326.065) 140.781,333.806 cw(c142.577,332.01) 142.577,334.55 148.729,334.55 ccw(c148.729,337.09) 150.445,335.218 ccw(c148.729,337.09) 150.525,335.294 v2(150.564,335.333)
  Bottom Layer w0.559: v2@150.562,335.335 v2@150.564,335.336
DOUT20_LED2: LED20_LED2.2 LED21_LED2.4 | length 22.8
  Top Layer w0.559: LED20_LED2.2@454.426,297.46 v2@456.022,297.46 ; v2@474.353,297.642 LED21_LED2.4@475.948,297.642
  Bottom Layer w0.305: v2(456.022,297.463) 456.577,296.908 457.117,296.368 ccw(c458.422,297.673) 458.422,295.827 459.186,295.827 471.906,295.827 ccw(c471.906,297.344) 472.979,296.272 v2(474.353,297.645)
DOUT20_LED3: LED20_LED3.2 LED21_LED3.4 | length 22.7
  Top Layer w0.559: LED20_LED3.2@627.378,200.379 v2@628.974,200.379 ; v2@639.925,189.559 LED21_LED3.4@641.52,189.559
  Bottom Layer w0.305: v2(628.974,200.376) 628.974,193.878 ccw(c631.514,193.878) 629.718,192.082 630.275,191.525 ccw(c631.875,193.126) 631.875,190.862 637.566,190.862 cw(c637.566,188.322) 639.215,190.254 cw(c637.566,188.322) 639.362,190.118 v2(639.925,189.556)
DOUT20_LED4: LED20_LED4.2 LED21_LED4.4 | length 21.1
  Top Layer w0.559: LED21_LED4.4@630.957,119.862 v2@632.553,119.862 ; v2@637.336,105.164 LED20_LED4.2@638.931,105.164
  Bottom Layer w0.305: v2(632.553,119.865) 632.553,108.655 ccw(c635.093,108.655) 633.297,106.859 634.533,105.623 ccw(c635.633,106.724) 635.633,105.167 v2(637.336,105.167)
DOUT20_LED5: LED20_LED5.2 LED21_LED5.4 | length 19.1
  Top Layer w0.559: LED21_LED5.4@454.808,254.432 v2@456.404,254.432 ; LED20_LED5.2@462.562,241.664 v2@464.158,241.664
  Bottom Layer w0.305: v2(456.404,254.435) 463.414,247.425 cw(c461.618,245.629) 464.158,245.629 v2(464.158,241.668)
DOUT20_LED6: LED20_LED6.2 LED21_LED6.4 | length 16.8
  Top Layer w0.559: LED20_LED6.2@462.806,219.464 v2@464.401,219.464 ; v2@477.183,216.972 LED21_LED6.4@478.778,216.972
  Bottom Layer w0.305: v2(464.401,219.46) 464.83,219.032 ccw(c466.626,220.828) 466.626,218.288 474.812,218.288 cw(c474.812,215.748) 476.608,217.544 v2(477.183,216.969)
DOUT20_LED7: LED20_LED7.2 LED21_LED7.4 | length 11.8
  Top Layer w0.305: LED21_LED7.4@255.06,115.533 259.672,115.533 ccw(c259.672,117.568) 261.112,116.129 cw(c262.847,114.393) 262.847,116.848 LED20_LED7.2@266.489,116.848
DOUT20_LED8: LED20_LED8.2 LED21_LED8.4 | length 10.9
  Top Layer w0.305: LED21_LED8.4@202.782,279.456 205.735,279.456 ccw(c205.735,281.996) 207.531,280.2 210.109,282.778 cw(c211.905,280.982) 211.905,283.522 LED20_LED8.2@212.184,283.522
DOUT20_LED9: LED20_LED9.2 LED21_LED9.4 | length 24.3
  Top Layer w0.559: v2@221.125,231.933 LED21_LED9.4@222.721,231.933 ; LED20_LED9.2@223.411,212.352 v2@225.006,212.352
  Bottom Layer w0.305: v2(221.125,231.93) 224.262,228.793 cw(c222.466,226.997) 225.006,226.997 v2(225.006,212.355)
DOUT21_LED9: LED21_LED9.2 LED189.4 | length 22.9
  Top Layer w0.559: LED189.4@216.65,248.037 v2@218.246,248.037 ; LED21_LED9.2@217.721,228.633 v2@219.317,228.633
  Bottom Layer w0.305: v2(218.246,248.033) 218.573,247.707 cw(c216.777,245.911) 219.317,245.911 v2(219.317,228.63)
ESP_EN: C3.2 D2.2 J2.6 R1.2 SW1.2 U1.3 | length 20.4
  Top Layer w0.305: v2(682.069,2.928) v2(693.661,2.928)
  Bottom Layer w0.305: v2@682.053,2.928 J2.6@682.053,5.137
  Bottom Layer w0.559: U1.3@693.793,10.8 693.793,5.783 694.287,5.29 694.287,4.502 694.21,4.426